# Altium PCB EMGfrontend.PcbDoc
Units mil, origin at the board's own origin, x right, y up, seen from the top; angles counter-clockwise.
Board outline 1790 x 1350 mil, 2 copper layers (Top Layer, Bottom Layer), stack 62.2 mil thick; 35 components, 25 nets, 96 pads, 26 vias.
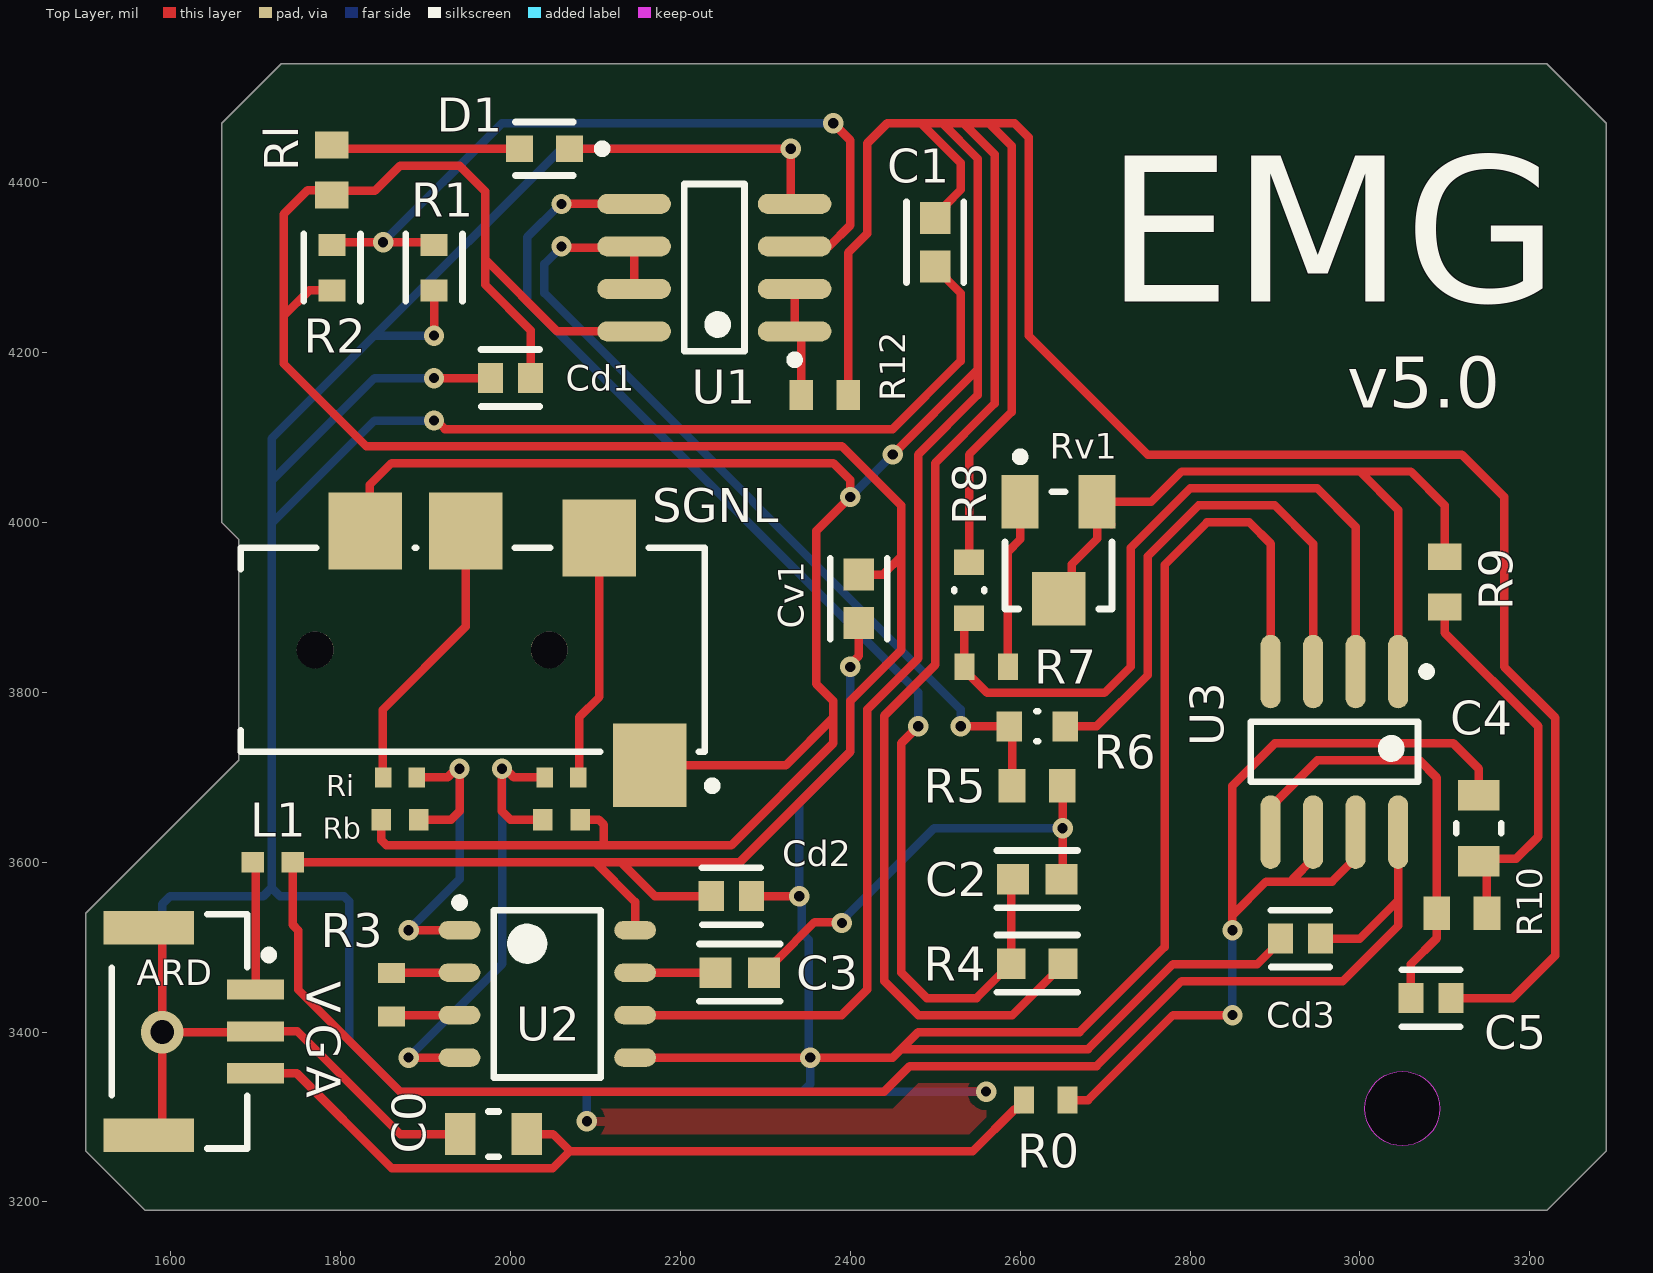
[diagram p0: Top Layer view]
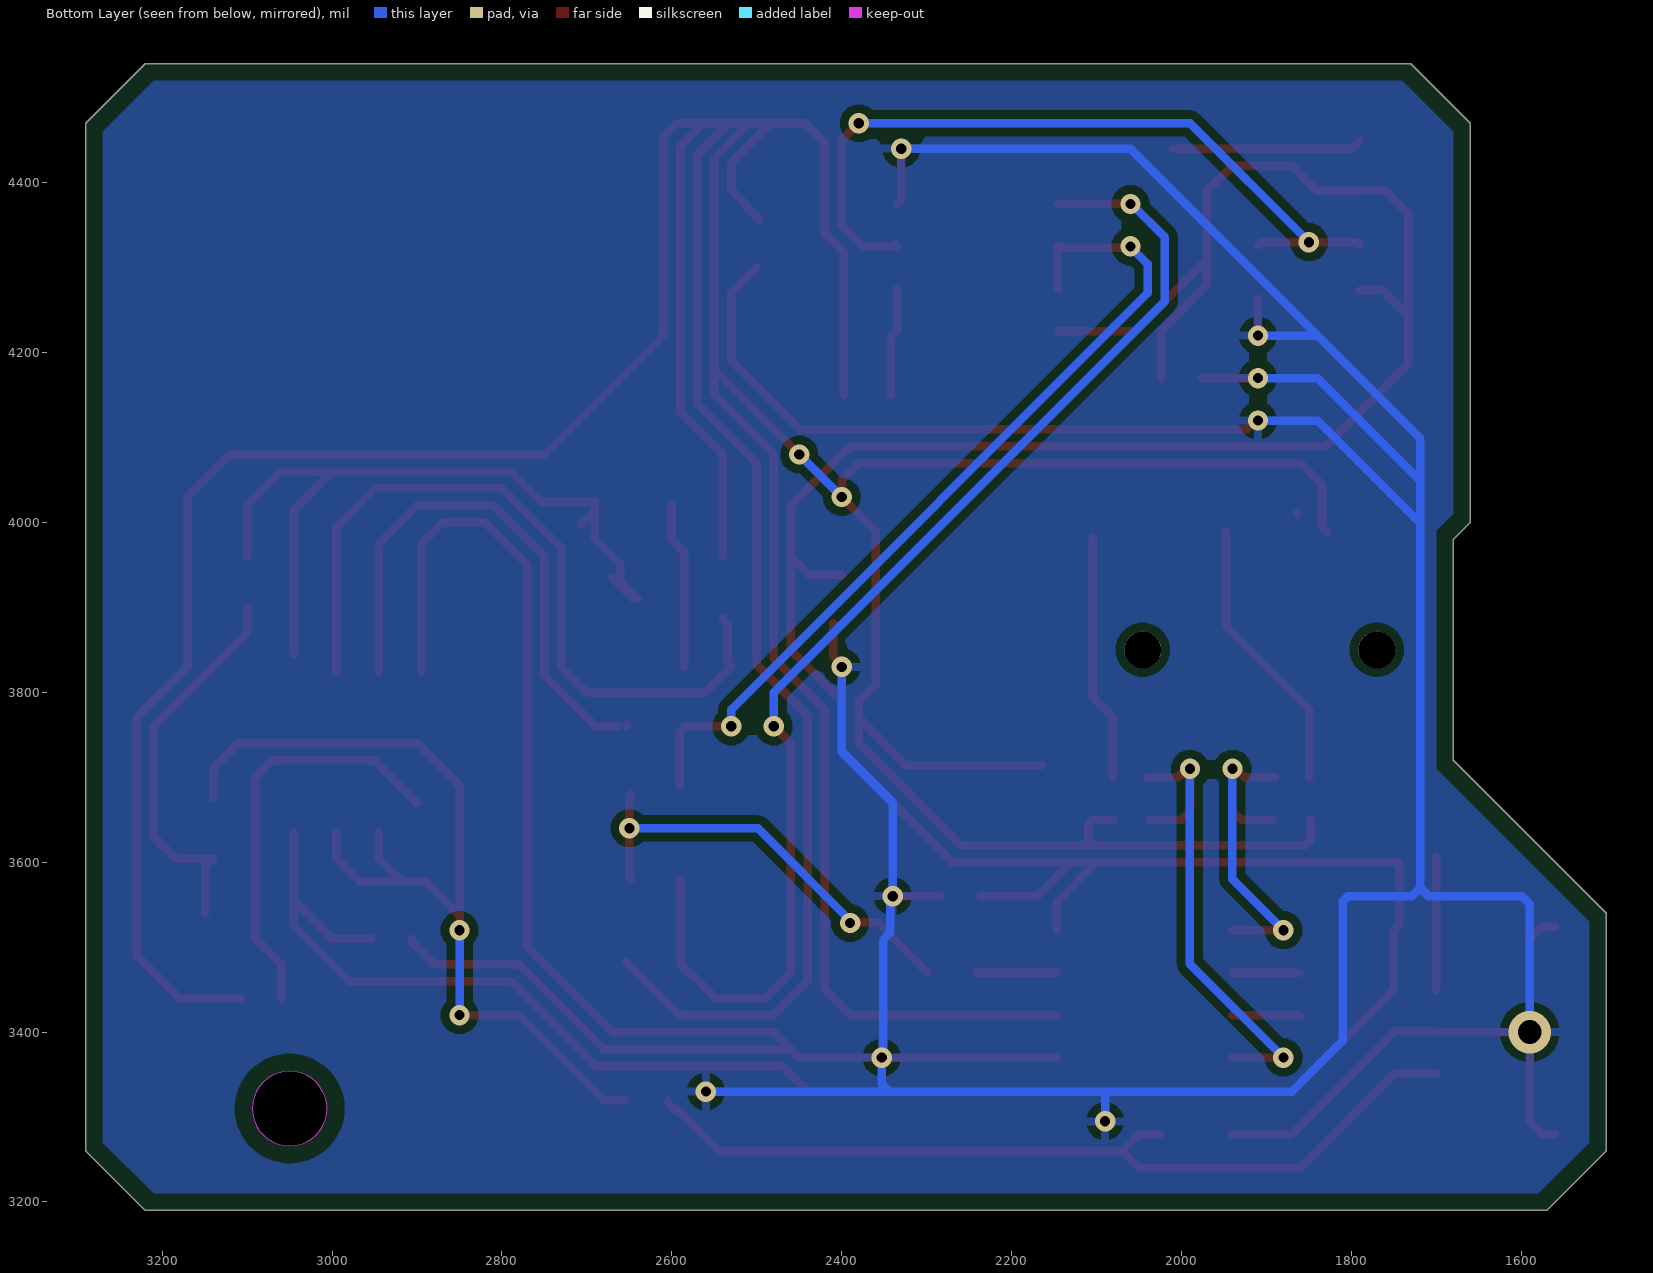
[diagram p1: Bottom Layer view, seen from below]
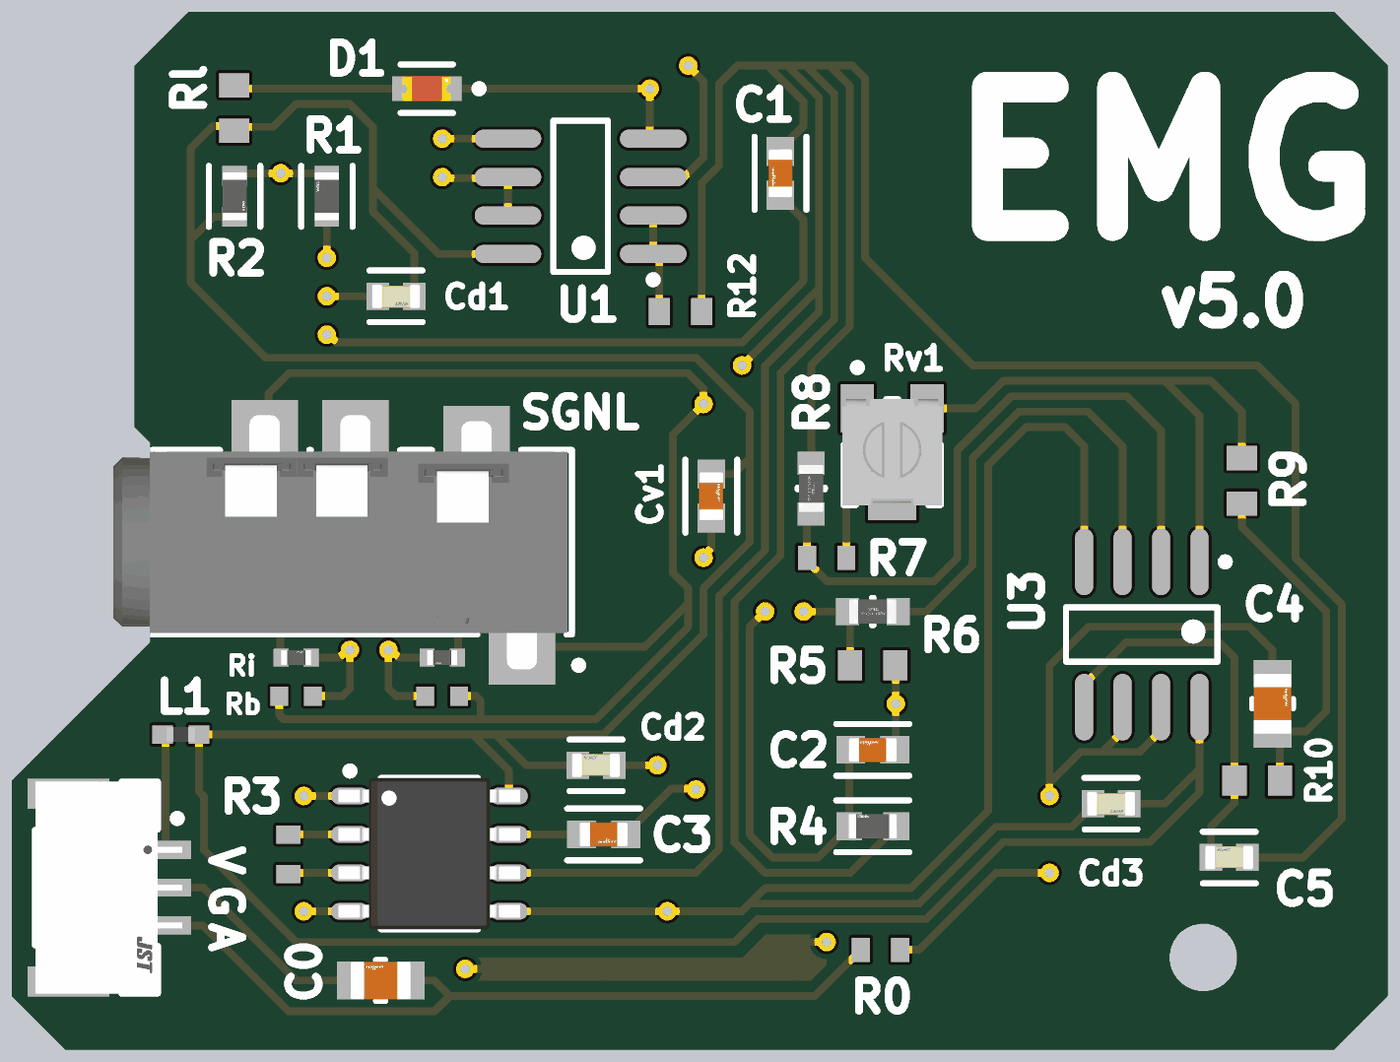
[diagram p2: 3D render of the assembled board from above, using the file's embedded part models]

## Layer stack, top to bottom
Top Solder: solder mask 0.4, Solder Resist, Dk 3.5
Top Layer: signal copper 1.4
Dielectric 1: dielectric 59.4, FR-4, Dk 4.8
Bottom Layer: signal copper 1.4
Bottom Solder: solder mask 0.4, Solder Resist, Dk 3.5

## Board outline
1500,3260 1500,3540 1680,3720 1680,3980 1660,4000 1660,4470 1730,4540 3220,4540 3290,4470 3290,3260 3220,3190 1570,3190
cut-out: 3050,3266 cw(c3050,3310) 3006,3310 cw(c3050,3310) 3050,3354 cw(c3050,3310) 3094,3310 cw(c3050,3310)

## Design rules (kind name [scope] priority, off if disabled: settings)
Clearance Cutout-clearance [InPolygon vs IsBoardCutoutRegion] p1: gap=20 ignorepadtopadclearanceinfootprint=FALSE
Clearance [All] p2: gap=10 ignorepadtopadclearanceinfootprint=FALSE
PolygonConnect [All] p1: connectstyle=Relief reliefconductorwidth=10 reliefentries=4 polygonreliefangle="90 Angle" airgapwidth=10
RoutingVias [All] p1: holewidth=12 width=24 viastyle="Through Hole" minholewidth=12 minwidth=24 maxholewidth=28 maxwidth=50
SolderMaskExpansion [All] p1: expansion=4 istentingtop=FALSE
Width [All] p1: maxlimit=10 minlimit=10 preferedwidth=10
30 further rules are at their usual default settings.

## Classes and differential pairs
component class VREF: C1 Cd1 R1 R2 R12 U1
component class LPF(500Hz): C4 C5 Cd3 R9 R10
component class HPF(20Hz): C2 C3 R4 R5
component class EMGfrontend: ARD C0 Cv1 D1 L1 R0 Rl SGNL
component class AMP2: R6 R7 R8 Rv1 U3
component class AMP1: Cd2 R3 U2

## Components (designator, comment, footprint, x,y, rotation, side; value= is the part's Value field where it differs from the comment)
ARD "SM03B-GHS-TB(LF)(SN)" FP-SM03B-GHS-TB_LF_SN-MFG 1610.43,3400.79 r270 top
C0 "GRM2165C1H223JA01D" FP-GRM216-0_1-0_05-D 1980,3280 r180 top
C1 "GRT188R61H105KE13D" FP-GRT188-0_1-E0_2_0_5-IPC_B 2500,4330 r270 top
C2 "GRT188R61H105KE13D" FP-GRT188-0_1-E0_2_0_5-IPC_B 2620,3580 r180 top
C3 "GRT188R61H105KE13D" FP-GRT188-0_1-E0_2_0_5-IPC_B 2270,3470 r0 top
C4 "GRM2165C1H223JA01D" FP-GRM216-0_1-0_05-D 3140,3640 r90 top
C5 "C0603C103J3GAC7411" FP-C0603C-CF-MFG 3083.62,3440 r0 top value="10,000 pF"
Cd1 "C0603C104J5RACTU" FP-C0603C-CF-MFG 2000,4170 r180 top value="0.10 μF"
Cd2 "C0603C104J5RACTU" FP-C0603C-CF-MFG 2260,3560 r0 top value="0.10 μF"
Cd3 "C0603C104J5RACTU" FP-C0603C-CF-MFG 2930,3510 r180 top value="0.10 μF"
Cv1 "GRT188R61H105KE13D" FP-GRT188-0_1-e0_2_0_5-IPC_B 2410,3910 r90 top
D1 "SML-LX0603SIW-TR" FP-SML-LX0603SIW-TR-MFG 2040,4440 r180 top
L1 "7427927170" SMD-0402 1720,3600 r0 top
R0 "RC0603FR-07470RL" RESC1608X55X25LL10T15 2630,3320 r180 top
R1 "RC0603FR-0710KL" FP-RC0603-0_55-IPC_C 1910,4300 r90 top
R2 "RC0603FR-0710KL" FP-RC0603-0_55-IPC_C 1790,4300 r270 top
R3 "RC0603FR-0715KL" RESC1608X55X25LL10T15 1859.85,3444.05 r90 top
R4 "AC0603FR-1311KL" FP-AC0603-IPC_B 2620,3480.58 r180 top
R5 "RC0603FR-075K6L" RESC1608X55X25ML10T15 2620,3690 r180 top
R6 "RP73PF1J1K0BTDF" FP-RP73P-1J-MFG 2620,3760 r0 top value=1KΩ
R7 "RC0603FR-0739KL" RESC1608X55X25LL10T15 2560,3830 r0 top
R8 "RP73PF1J1K0BTDF" FP-RP73P-1J-MFG 2540,3920 r270 top value=1KΩ
R9 "RC0603FR-0722KL" RESC1608X55X25ML10T15 3100,3930 r270 top
R10 "RC0603FR-0722KL" RESC1608X55X25ML10T15 3120,3540 r180 top
R12 "RC0603FR-0722RL" RESC1608X55X25NL10T15 2370,4150 r0 top
Rb "RC0402FR-0710ML" RESC1005X40X25MML05T10 1870,3650 r180 top (schematic designator Rb2)
Rb1 "RC0402FR-0710ML" RESC1005X40X25MML05T10 2060,3650 r0 top
Ri "RC0402FR-075KL" FP-RC0402-MFG-TINY 1870,3700 r0 top value=5kΩ (schematic designator Ri2)
Ri1 "RC0402FR-075KL" FP-RC0402-MFG-TINY 2060,3700 r180 top value=5kΩ
Rl "RC0603FR-07620RL" RESC1608X55X25ML10T15 1789.44,4414.92 r270 top (schematic designator RL)
Rv1 "3313J-1-203E" BOUR-3313J-1_V 2645.28,3967.09 r270 top
SGNL "SJ2-3574A-SMT-TR" FP-SJ2-3574A-SMT-TR-MFG 1927.48,3850 r0 top locked
U1 "MCP6002T-E/SN" SOIC-SN8_N 2240,4300 r180 top
U2 "AD8226ARZ" ADI-R-8_L 2043.35,3445 r0 top
U3 "MCP6002T-E/SN" SOIC-SN8_N 2970,3730 r270 top

## Footprints (in the part's own frame and the unit in brackets; to place one, negate y for a bottom-side part, rotate by r counter-clockwise, add the part's x,y. Pads: shape width x height; smd on the part's side, far side on the other; paste and mask are expansions set on the pad)
ADI-R-8_L [mm] "SOIC, 8-Leads, Body 5x4mm, Pitch 1.27mm, IPC High Density"
  oval 1.25x0.55 smd: 1(-2.625,1.905) 2(-2.625,0.635) 3(-2.625,-0.635) 4(-2.625,-1.905) 5(2.625,-1.905) 6(2.625,-0.635) 7(2.625,0.635) 8(2.625,1.905)
  silkscreen extent -2.75,-2.5 1.6,2.85, body extent -3,-2.5 3,2.5, height 1.75
BOUR-3313J-1_V [mm] "SMD, 3-Leads, Body 3.5x3.2mm, Pitch 1.15mm"
  rect 1.6x1.1 smd paste+0: 1(-1.45,-1.15) 3(-1.45,1.15)
  rect 1.6x1.6 smd paste+0: 2(1.45,0)
  silkscreen extent -2.92,-1.6 1.75,1.6, body extent -1.75,-1.65 1.75,1.65, height 2.11
FP-AC0603-IPC_B [mil]
  rect 33.81x35.91 smd paste+0 mask+0: 1(-30.58,0) 2(30.58,0)
  silkscreen extent -47,-34 47,34, body extent -57,-28 57,28, height 10
FP-C0603C-CF-MFG [mm]
  rect 0.75x0.9 smd paste+0 mask+0: 1(-0.6,0) 2(0.6,0)
  silkscreen extent -0.87,-0.85 0.88,0.85, body extent -1.2,-0.6 1.2,0.6, height 0.25
FP-GRM216-0_1-0_05-D [mil]
  rect 36x49.21 smd paste+0 mask+0: 1(-39,0) 2(39,0)
  silkscreen extent -6,-27 6,27, body extent -51,-31 51,31, height 10
FP-GRT188-0_1-E0_2_0_5-IPC_B [mil]
  rect 37.74x35.91 smd paste+0 mask+0: 1(-28.61,0) 2(28.61,0)
  silkscreen extent -47,-34 47,34, body extent -57,-28 57,28, height 10
FP-GRT188-0_1-e0_2_0_5-IPC_B [mil]
  rect 37.74x35.91 smd paste+0 mask+0: 1(-28.61,0) 2(28.61,0)
  silkscreen extent -47,-34 47,34, body extent -57,-28 57,28, height 10
FP-RC0402-MFG-TINY [mm]
  rect 0.5x0.6 smd paste+0 mask+0: 1(-0.5,0) 2(0.5,0)
  body extent -0.85,-0.4 0.85,0.4, height 0.25
FP-RC0603-0_55-IPC_C [mil]
  rect 25.93x31.97 smd paste+0 mask+0: 1(-26.64,0) 2(26.64,0)
  silkscreen extent -40,-33 40,33, body extent -44,-22 44,22, height 10
FP-RP73P-1J-MFG [mil]
  rect 30x35.43 smd paste+0 mask+0: 1(-33,0) 2(33,0)
  silkscreen extent -1,-18 1,18, body extent -59,-22 59,22, height 10
FP-SJ2-3574A-SMT-TR-MFG [mm]
  rect 2.2x2.5 smd paste+0 mask+0: 1(6,-3.45)
  rect 2.2x2.3 smd paste+0 mask+0: 2(4.5,3.35) 3(0.5,3.55) 4(-2.5,3.55)
  round 1.1 hole 1.1 unplated paste-2539.97 mask+0: ""(-4,0) ""(3,0)
  silkscreen extent -6.22,-4.19 8,3.05, body extent -7.75,-4.8 7.75,4.8, height 0.25
FP-SM03B-GHS-TB_LF_SN-MFG [mm]
  rect 0.6x1.7 smd paste+0 mask+0: 1(-1.25,2.275) 2(0,2.275) 3(1.25,2.275)
  rect 1x2.7 smd paste+0 mask+0: 4(-3.1,-0.925) 5(3.1,-0.925)
  silkscreen extent -3.5,-2.03 3.5,2.79, body extent -3.7,-2.37 3.7,3.22, height 0.25
FP-SML-LX0603SIW-TR-MFG [mm]
  rect 0.8x0.8 smd paste+0 mask+0: 1(-0.75,0) 2(0.75,0)
  silkscreen extent -1.85,-0.8 0.86,0.8, body extent -1.25,-0.56 1.25,0.56, height 0.25
RESC1005X40X25MML05T10 [mil] "Chip Resistor, 2-Leads, Body 1.00x0.50mm, IPC High Density"
  rect 23x25 smd: 1(-22,0) 2(22,0)
  body extent -21,-11 21,11, height 16
RESC1608X55X25LL10T15 [mm] "Chip Resistor, 2-Leads, Body 1.70x0.90mm, IPC High Density"
  rect 0.6x0.8 smd: 1(-0.65,0) 2(0.65,0)
  body extent -0.85,-0.45 0.85,0.45, height 0.55
RESC1608X55X25ML10T15 [mm] "Chip Resistor, 2-Leads, Body 1.70x0.90mm, IPC Low Density"
  rect 0.8x1 smd: 1(-0.75,0) 2(0.75,0)
  body extent -0.85,-0.45 0.85,0.45, height 0.55
RESC1608X55X25NL10T15 [mm] "Chip Resistor, 2-Leads, Body 1.70x0.90mm, IPC Medium Density"
  rect 0.7x0.9 smd: 1(-0.7,0) 2(0.7,0)
  body extent -0.85,-0.45 0.85,0.45, height 0.55
SMD-0402 [mm] "Chip Inductor, 2-Leads, Body 1.0x0.5mm"
  rect 0.675x0.6 smd: 1(-0.6,0) 2(0.6,0)
  body extent -0.5,-0.25 0.5,0.25, height 0.49
SOIC-SN8_N [mm] "SOIC, 8-Leads, Body 4.9x3.9mm, Pitch 1.27mm, IPC Medium Density"
  oval 2.2x0.6 smd: 1(-2.4,1.905) 2(-2.4,0.635) 3(-2.4,-0.635) 4(-2.4,-1.905) 5(2.4,-1.905) 6(2.4,-0.635) 7(2.4,0.635) 8(2.4,1.905)
  silkscreen extent -2.53,-2.5 0.9,2.88, body extent -2,-2.5 2,2.5, height 1.75

## Part data
ARD: library part CMP-17439-000068-1, "CONN HEADER SMD R/A 3POS 1.25MM", Color=Natural, Current Rating=1A, Flammability Rating="UL94 V-0", Max Operating Temperature=85°C, Min Operating Temperature=-25°C, Voltage Rating=50V, Connector Type=Header, Contact Finish - Mating=TIN, Contact Material=Bronze, Contact Plating=Tin, Contact Shape=Rectangular, Contact Type="Outer Shroud Contact", Fastening Type=Ramp, Gender=Male, Housing Color=Natural, Housing Material=Nylon, Insulation Color=Natural, Insulation Material=Nylon, Lead Free="Lead Free", Mount="Surface Mount", Number of Contacts=3, Number of Positions=3, Number of Rows=1, Orientation="Right Angle", Packaging="Tape and Reel", Pitch=0.049inch, REACH SVHC="No SVHC", Series=GH, Termination=Solder, Voltage Rating (AC)=50V, Wire/Cable Gauge=26AWG
C0 C4: library part CMP-06035-050815-1, "Chip Multilayer Ceramic Capacitors for General Purpose, 0805, 22000pF, C0G, 30ppm/°C, 5%, 50V"
C1 C2 C3 Cv1: library part CMP-06035-031856-1, "Multi-Layer Ceramic Capacitor 1uF 50V X5R ±10% 0603 Paper T/R", Capacitance=1uF, Case Code (Imperial)=0603, Case Code (Metric)=1608, Dielectric=X5R, Max Operating Temperature=85°C, Min Operating Temperature=-55°C, Ratings=AEC-Q200, Tolerance=10%, Voltage Rating=50V, Case/Package=0603, Length=0.063inch, Mount="Surface Mount", Packaging="Tape and Reel", Thickness=0.035inch, Voltage Rating (DC)=50V, Width=0.031inch
C5: library part CMP-03020-031050-2, "C0603 10,000 pF C0G 30ppm/°C 5.00% 25 V", Capacitance="10,000 pF", Manufacturer=KEMET, Package=C0603C-CF, Temperature="-55°C to +125°C", Temperature Characteristic=C0G, Temperature Coefficient=30ppm/°C, Temperature Range High=+125°C, Temperature Range Low=-55°C, Tolerance=0.05, Voltage Rating="25 V", Automotive=Yes, Automotive Grade="Grade 1", Category=Cap, ComponentLink2Description=Datasheet, ComponentLink2URL=https://api.kemet.com/component-edge/download/datasheet/C0603C100J5GACAUTO.pdf, Device Class L1="Passive Components", Device Class L2=Capacitors, Device Class L3="Ceramic Capacitors", Height=0.87mm, Lead Free=Yes, Manufacturer Part Number=C0603C103J3GAC7411, Material=Ceramic, Octopart=https://octopart.com/c0603c103j3gac7411-kemet-91893810, RoHS=TRUE
Cd1 Cd2 Cd3: library part CMP-2006-03056-2, "CAP CER 0.1UF 50V 5% X7R 0603", Capacitance="0.10 μF", Manufacturer=KEMET, Package=C0603C-CF, Temperature="-55°C to +125°C", Temperature Characteristic=X7R, Temperature Coefficient=30ppm/°C, Temperature Range High=+125°C, Temperature Range Low=-55°C, Tolerance=0.05, Voltage Rating="50 V", Automotive=Yes, Automotive Grade="Grade 1", Category=Cap, ComponentLink2Description=Datasheet, ComponentLink2URL=https://api.kemet.com/component-edge/download/datasheet/C0603C100J5GACAUTO.pdf, Device Class L1="Passive Components", Device Class L2=Capacitors, Device Class L3="Ceramic Capacitors", Digikey Description="CAP CER 0.1UF 50V 5% X7R 0603", Height=0.87mm, Lead Free=Yes, Manufacturer Part Number=C0603C104J5RACTU, Material=Ceramic, Mouser Description="Multilayer Ceramic Capacitors MLCC - SMD/SMT 50volts 0.1uF X7R 5%", Octopart=https://octopart.com/c0603c104j5ractu-kemet-10440638, RoHS=TRUE
D1: library part CMP-57192-000009-1, "LED RED DIFFUSED SMD", Case Code (Imperial)=0603, Case Code (Metric)=1608, Color=Red, Forward Current=20mA, Forward Voltage=2V, Lens Color=White, Max Operating Temperature=85°C, Min Operating Temperature=-25°C, Package Quantity=1, Power Rating=50mW, Approvals=UL, Case/Package=0603, Dominant Wavelength=636nm, Height=0.6mm, Illumination Color=Red, Lead Free="Lead Free", Length=1.6mm, Lens Style=Diffused, Lens Transparency=Diffused, Luminous Intensity=60mcd, Moisture Sensitivity Level=2, Mount="Surface Mount", Number of LEDs=1, Number of Pins=2, Packaging="Tape and Reel", REACH SVHC="No SVHC", RoHS Compliant=Yes, Test Current=20mA, Viewing Angle=140°, Wavelength=636nm, Width=0.8mm
L1: library part CMP-0220-00142-1, "SMD EMI Suppression Ferrite Bead WE-CBF, Z = 75 Ohm", ComponentLink1Description="Manufacturer Link", ComponentLink1URL=http://www.we-online.com, ComponentLink2Description=Datasheet, ComponentLink2URL=http://www.we-online.de/katalog/media/pdf/7427927170.pdf, DatasheetVersion="ver 1, Jul-2009", Impedance="75 Ohm", PackageDescription="Chip Inductor, 2-Leads, Body 1.0 x 0.5 mm", PackageReference=SMD-0402, PackageVersion=2009
R0: library part CMP-1659-00035-2, "General Purpose Chip Resistor, 470 Ohm, +/- 1%, -55 to 155 degC, 0603 (1608 Metric), RoHS, Tape and Reel", Max Operating Temperature="90 degC", Min Operating Temperature="-40 degC", Package Quantity=2500, Resistance="470 Ohm", ComponentLink1Description="Manufacturer URL", ComponentLink1URL=http://www.yageo.com/, ComponentLink2Description=Datasheet, ComponentLink2URL=https://datasheet.ciiva.com/11808/0900766b80f96399-11808177.pdf, Contact Material=Brass, Contact Plating=Gold, DatasheetVersion="Rev. 4, 04/2009", Fastening Type=Snap, Height="1.25 mm", Length="3 mm", Mount="Surface Mount", PackageDescription="2-Pin Surface Mount Device, Body 1.6 x 0.8 mm", PackageReference=0603, Packaging="Tape and Reel", Radiation Hardening=No, RoHSCompliant=true, Width="3.1 mm"
R1 R2: library part CMP-2100-03664-2, "RES 10K OHM 1% 1/10W 0603", Case Code (Imperial)=0603, Case Code (Metric)=1608, Max Operating Temperature=155°C, Max Power Dissipation=100mW, Min Operating Temperature=-55°C, Resistance=10kR, Resistance Tolerance=1%, Resistor Type="Thick Film", Temperature Coefficient=100ppm/°C, Voltage Rating=75V, Voltage Rating (DC)=50V, Case/Package=0603, Construction=Rectangular, Depth=0.8mm, Features="Moisture Resistant", Height=0.45mm, Lead Free="Lead Free", Lead Pitch=0.3mm, Length=1.6mm, Military Standard=Not, Number of Pins=2, Number of Terminations=2, Packaging="Tape and Reel", Power Rating=100mW, RoHS Compliant=Yes, Series=RC, Size Code=0603, Termination=SMD/SMT, Tolerance=1%, Weight=7.1E-05oz, Width=0.8mm
R3: library part CMP-1659-00032-1, "Chip Resistor, 15 KOhm, +/- 1%, 0.1 W, -55 to 155 degC, 0603 (1608 Metric), RoHS, Tape and Reel", ComponentLink1Description="Manufacturer URL", ComponentLink1URL=http://www.yageo.com/, ComponentLink2Description=Datasheet, ComponentLink2URL=http://www.yageo.com/documents/recent/PYu-RC_Group_51_RoHS_L_04.pdf, DatasheetVersion="Rev. 4, 02/2016", PackageDescription="2-Pin Surface Mount Device, Body 1.6 x 0.8 mm", PackageReference=0603, RoHSCompliant=true
R4: library part CMP-03412-047641-1, "RES 11KΩ 1.00% 0.1W 0603", RoHS Compliant=Yes
R5: library part CMP-1012-00595-2, "Chip Resistor, 5.6 KOhm, +/- 1%, 0.1 W, -55 to 155 degC, 0603 (1608 Metric), RoHS, Tape and Reel", Case Code (Imperial)=0603, Case Code (Metric)=1608, Max Operating Temperature="155 degC", Min Operating Temperature="-55 degC", Package Quantity=5000, Power Rating="100 mW", Resistance="332 kohm", Tolerance=1%, Type (Resistor)="Thick Film", Voltage Rating="50 V", Case\Package=0603, ComponentLink1Description="Manufacturer URL", ComponentLink1URL=http://www.yageo.com/, ComponentLink2Description=Datasheet, ComponentLink2URL=http://www.yageo.com/documents/recent/PYu-RC_Group_51_RoHS_L_04.pdf, DatasheetVersion="Rev. 4, 02/2016", Height="0.45 mm", Length="1.6 mm", PackageDescription="2-Pin Surface Mount Device, Body 1.6 x 0.8 mm", PackageReference=0603, Packaging="Tape and Reel", RoHSCompliant=true, Width="0.8 mm"
R6 R8: library part CMP-03211-004517-1, "RES SMD 1K OHM 0.1% 1/6W 0603", Manufacturer="TE Connectivity", Package=RP73P-1J, Power Rating=0.166W, Resistance=1KΩ, Temperature="-55°C to +155°C", Temperature Coefficient=25ppm/°C, Temperature Range High=+155°C, Temperature Range Low=-55°C, Tolerance=0.001, Voltage Rating=100V, Automotive=No, Category=Res, ComponentLink2Description=Datasheet, ComponentLink2URL=https://www.te.com/commerce/DocumentDelivery/DDEController?Action=srchrtrv&DocNm=1773272&DocType=DS&DocLang=English, Composition="Thin Film", Device Class L1="Passive Components", Device Class L2=Resistors, Device Class L3="Chip SMD Resistors", Digikey Description="RES SMD 1K OHM 0.1% 1/6W 0603", Height=0.55mm, Ipc Land Pattern Name=RESC15580X45, Lead Free=Yes, Manufacturer Part Number=RP73PF1J1K0BTDF, Octopart=https://octopart.com/rp73pf1j1k0btdf-te+connectivity-45465729, RoHS=TRUE, Series=RP73P
R7: library part CMP-2000-06940-1, "Chip Resistor, 39 KOhm, +/- 1%, 0.1 W, -55 to 155 degC, 0603 (1608 Metric), RoHS, Tape and Reel", Case Code - in=0603, Case Code - mm=1608, Manufacturer=Yageo, Operating Temperature Range=-55Cto+155C, Package Description="2-Pin Surface Mount Device, Body 1.6 x 0.8 mm", Power Rating=100mW, Resistance=39kOhms, Temperature Coefficient=100PPM/C, Tolerance=1%, Voltage Rating=50V, Datasheet URL=http://www.yageo.com/documents/recent/PYu-RC_Group_51_RoHS_L_7.pdf, Datasheet Version="Rev. 7, 05/2017", Manufacturer URL=http://www.yageo.com/, Mounting Technology=SurfaceMount, Package Reference=0603, Packaging=Reel, Product=ThickFilmResistorsGeneralPurpose, Series=RC, Termination Style=SMD/SMT
R9 R10: library part CMP-1012-00659-3, "Chip Resistor, 22 KOhm, +/- 1%, 0.1 W, -55 to 155 degC, 0603 (1608 Metric), RoHS, Tape and Reel", Case/Package=Radial, Current Rating="290 mA", Max Operating Temperature=105degC, Min Operating Temperature=-55degC, Package Quantity=100, Resistance="2.9 Ohm", Tolerance=10%, ComponentLink1Description="Manufacturer URL", ComponentLink1URL=http://www.yageo.com/, ComponentLink2Description=Datasheet, ComponentLink2URL=http://www.yageo.com/documents/recent/PYu-RC_Group_51_RoHS_L_04.pdf, DatasheetVersion="Rev. 4, 02/2016", Diameter="8.5 mm", Height="11 mm", Lead Pitch="5 mm", Mount="Through Hole", PackageDescription="2-Pin Surface Mount Device, Body 1.6 x 0.8 mm", PackageReference=0603, Packaging=Bulk, Pins=2, Radiation Hardening=No, REACH SVHC="No SVHC", RoHSCompliant=True, Shielding=Unshielded
R12: library part CMP-1659-00033-1, "Chip Resistor, 22 Ohm, +/- 1%, 0.1 W, -55 to 155 degC, 0603 (1608 Metric), RoHS, Tape and Reel", Case\Package=SIP, Max Input Voltage="1.4 V", Max Operating Temperature="100 degC", Max Ouput Current="8 A", Min Operating Temperature="-25 degC", Package Quantity=200, ComponentLink1Description="Manufacturer URL", ComponentLink1URL=http://www.yageo.com/, ComponentLink2Description=Datasheet, ComponentLink2URL=http://www.yageo.com/documents/recent/PYu-RC_Group_51_RoHS_L_04.pdf, DatasheetVersion="Rev. 4, 02/2016", Height="19.6 mm", Length="18.5 mm", Mount="Through Hole", Output Current="8 A", PackageDescription="2-Pin Surface Mount Device, Body 1.6 x 0.8 mm", PackageReference=0603, Packaging=Rail/Tube, Pins=4, Radiation Hardening=No, REACH SVHC=Unknown, RoHSCompliant=true
Rb Rb1: library part CMP-2002-07354-1, Manufacturer="Yageo / Phycomp", Part Number=RC0402FR-0710ML
Ri Ri1: library part CMP-03412-013078-1, "RES SMD 5K OHM 1% 1/16W 0402", Manufacturer=Yageo, Package=RC0402, Power Rating=0.0625W, Resistance=5kΩ, Temperature="-55°C to +155°C", Temperature Coefficient=100ppm/°C, Temperature Range High=+155°C, Temperature Range Low=-55°C, Tolerance=1%, Voltage Rating=50V, Automotive=No, Category=Res, ComponentLink2Description=Datasheet, ComponentLink2URL=http://www.yageo.com/documents/recent/PYu-RC_Group_51_RoHS_L_10.pdf, Composition="Thick Film", Device Class L1="Passive Components", Device Class L2=Resistors, Device Class L3="Chip SMD Resistors", Digikey Description="RES SMD 5K OHM 1% 1/16W 0402", Footprint Url=https://pccomponents.com/datasheets/YAGEO-20RESISTORS.PDF, Height=0.4mm, Ipc Land Pattern Name=RESC10050X35, Lead Free=Yes, Manufacturer Part Number=RC0402FR-075KL, Octopart=https://octopart.com/rc0402fr-075kl-yageo-25450038, RoHS=TRUE, Series=RC_L
Rl: library part CMP-2000-04103-1, Manufacturer=Yageo, Part Number=RC0603FR-07620RL
Rv1: library part CMP-2000-05586-1, "3 mm Trimpot(R) Trimming Potentiometer, 20 KOhm, +/- 20%, 0.125 W, -55 to 125 degC, 3-Pin SMD, RoHS, Tape and Reel", Dielectric Strength=500VAC, Insulation Resistance=100Megohms(Min.)@500VDC, Manufacturer=Bourns, Package Description="3-Pin Surface Mount Device, Body 3.5 x 3.2 mm, Pitch 1.15 mm", Package Reference=3313J-1, Power, Rating=0.125W, Resistance=20Kilohms, Resistance, Insulation=100Megohms, Temperature Coefficient=±100ppm/°C, Temperature, Operating, Maximum=+125°C, Temperature, Operating, Minimum=-55°C, Tolerance=±20%, Angle, Mechanical=250°, Brand/Series=Trimpot®3313-SealedSeries, Datasheet URL=http://www.bourns.com/docs/Product-Datasheets/3313.pdf, Datasheet Version=05/2016, Dimensions="0.126\"Lx0.138\"Wx0.087\"H", Load Life=1000hr@0.125W,70°C, Manufacturer URL=http://www.bourns.com/, Material, Element=Cermet, Mounting Technology=SurfaceMount, Mounting Type=SurfaceMount, Number of Turns=1, Resolution=Infinite, Rotational Life=100Cycles, Standards=RoHSCompliant, Termination=SMD, Torque=50g-cm, Type=Trimmer
SGNL: library part CMP-14818-000001-1, "AUDIO JACK, 3.5 MM, RT, 4 CONDUC", Current Rating=1A, Manufacturer=CUI, Temperature="-25°C to +85°C", Temperature Range High=+85°C, Temperature Range Low=-25°C, Voltage Rating=12V, Automotive=No, Category=Conn, ComponentLink2Description=Datasheet, ComponentLink2URL=https://www.cui.com/product/resource/sj2-357x-smt.pdf, Conn Orientation=Horizontal, Contact Material=Silver, Device Class L1=Connectors, Device Class L2="Audio / Video Connectors", Device Class L3=unset, Digikey Description="AUDIO JACK, 3.5 MM, RT, 4 CONDUC", Height=5.3mm, Lead Free=Yes, Manufacturer Part Number=SJ2-3574A-SMT-TR, Number of Contacts=4, Octopart=https://octopart.com/sj2-3574a-smt-tr-cui-77838840, Package=SJ2-3574A-SMT-TR, RoHS=TRUE
U1 U3: library part CMP-0187-00363-3, "None", Case/Package=SOIC, Input Bias Current=1pA, Input Offset Voltage (Vos)=4.5mV, Max Operating Temperature=125°C, Max Supply Voltage=6V, Min Operating Temperature=-40°C, Min Supply Voltage=1.8V, Nominal Supply Current=100uA, Operating Supply Voltage=5.5V, Output Current=23mA, Package Quantity=3300, Power Supply Rejection Ratio (PSRR)=86dB, Voltage Gain=112dB, Amplifier Type="GENERAL PURPOSE", Common Mode Rejection Ratio=60dB, Gain Bandwidth Product=1MHz, Lead Free="Lead Free", Mount="Surface Mount", Number of Channels=2, Number of Circuits=2, Number of Elements=2, Number of Pins=8, Operating Supply Current=100uA, Output Current per Channel=23mA, Packaging="Tape and Reel", Radiation Hardening=No, RoHS Compliant=Yes, Series=-, Slew Rate=0.6V/µs, Supply Current=100uA, Technology=CMOS, Unity Gain Bandwidth Product=1MHz
U2: library part CMP-2000-05749-1, "Wide Supply Range, Rail-to-Rail Output Instrumentation Amplifier, 2.2 to 36 V, -40 to 125 degC, 8-Pin SOIC (R-8), RoHS, Tube", Current - Input Bias=20nA, Current - Output / Channel=13mA, Current - Supply=350µA, Manufacturer="Analog Devices", Operating Temperature=-40°C~125°C, Package / Case="8-SOIC(0.154\",3.90mmWidth)", Package Description="8-Pin Small Outline Package, Body 4.9 x 3.9 mm, Pitch 1.27 mm", Package Reference=R-8, Standard Package=98, Supplier Device Package=8-SOIC, Voltage - Input Offset=100µV, Voltage - Supply, Single/Dual (±)=2.2V~36V,±1.35V~18V, -3db Bandwidth=1.5MHz, Amplifier Type=Instrumentation, Category=IntegratedCircuits(ICs), Datasheet URL=http://www.analog.com/media/en/technical-documentation/data-sheets/AD8226.pdf, Datasheet Version="Rev. C, 09/2012", Design Resources=PLCandDCSUniversalAnalogInputUsingEither4or6-PinTerminalBlock, EDA / CAD Models=DownloadfromAcceleratedDesigns, Family=Linear-Amplifiers-Instrumentation,OPAmps,BufferAmps, Gain Bandwidth Product=-, Manufacturer URL=http://www.analog.com/, Mfg Application Notes=AutomaticExternalDefibrillator(AED)SolutionsElectromagneticFlowMeterSolutionsMotorControlSolution—ServoControlProgrammableLogicControllers(PLCs)SolutionsElectrocardiogram(ECG)Solutions, Mounting Technology=SurfaceMount, Mounting Type=SurfaceMount, Number of Circuits=1, Online Catalog=Instrumentation, Output Type=Rail-to-Rail, Packaging=Tube, PCN Design/Specification=PolyimideAlignmentTarget11/Aug/2015, Product Training Modules=CommonPhotodiodeOp-AmpCircuitProblemsandSolutionsIndirectCurrentFeedbackInstrumentationAmplifierApplicationsGuide, Series=-, Slew Rate=0.6V/µs

## Via types
v1: diameter 24, hole 12, Top Layer to Bottom Layer, 25 vias
v2: diameter 50, hole 28, Top Layer to Bottom Layer, 1 vias

## Nets (pads, with @x,y where several pads share a name; then routed paths per layer and width w, separated by ;. In a path a pad name is that pad's centre, name@x,y a point inside that pad or via, vN(x,y) a via of type N, cw(c..) or ccw(c..) an arc to the next point about the centre after c; other vN are vias at no path point)
NetARD_1: ARD.1 L1.1 | length 156.5
  Top Layer w10: ARD.1 L1.1@1700,3606.55
NetARD_2: ARD.2 ARD.4 ARD.5 C0.2 C1.2 Cd1.2 Cd2.2 Cd3.2 Cv1.1 D1.1 R1.1 U1.4 U2.5 U3.4 | length 7677.6
  Top Layer w10: ARD.5@1560,3280 1575.31,3280 1590,3294.69 v2(1590,3400) ; ARD.4@1560,3524.09 1575.31,3524.09 1590,3509.41 v2(1590,3400) ; v1(1910,4120) 1912.86,4120 1922.86,4110 2450,4110 2530,4190 2530,4270 C1.2@2500,4300 ; v1(1910,4170) Cd1.2 ; v1(1910,4220) R1.1@1910,4263.36 ; C0.2 1870,3280 1749.21,3400.79 ARD.2 1699.21,3400 v2(1590,3400) ; D1.1 v1(2330,4440) 2330,4379.49 U1.4 ; U2.5 v1(2352.86,3370) 2450,3370 2460,3380 ; Cd2.2@2284.01,3560 v1(2340,3560) ; v1(2400,3830) 2400,3832.86 2410,3842.86 Cv1.1 ; U3.4 2895,3975 2870,4000 2820,4000 2770,3950 2770,3500 2670,3400 2480,3400 2460,3380 ; Cd3.2 2906.38,3507.05 2896.61,3497.28 2879.33,3480 2780,3480 2680,3380 2460,3380
  Bottom Layer w10: v2(1590,3400) 1590,3550.72 1599.28,3560 1708.84,3560 1718.74,3569.9 ; v1(1910,4120) 1840,4120 1718.74,3998.74 ; v1(1910,4170) 1840,4170 1718.74,4048.74 ; v1(1910,4220) 1840,4220 ; v1(2090,3295) 2090,3330 ; v1(2330,4440) 2060,4440 1840,4220 ; 2342.68,3517.32 2342.68,3519.25 ; 2342.68,3520.25 2342.68,3557.32 v1(2340,3560) 2340,3670 2400,3730 v1(2400,3830) ; 2343.39,3516.61 2351.43,3508.57 2351.43,3371.43 v1(2352.86,3370) 2352.86,3338.72 2344.14,3330 ; v1(2560,3330) 2344.14,3330 ; 1718.74,3569.9 1718.74,3998.74 ; 1718.74,3569.9 1728.64,3560 1804.14,3560 1810,3554.14 1810,3390 1870,3330 2090,3330 ; 1718.74,3998.74 1718.74,4048.74 ; 1718.74,4048.74 1718.74,4098.74 1840,4220 ; 2090,3330 2344.14,3330
NetARD_3: ARD.3 C0.1 R0.2 | length 1038.9
  Top Layer w10: ARD.3 1748.43,3351.57 1860,3240 2050,3240 2070,3260 ; C0.1@2025.43,3280 2050,3280 2070,3260 ; R0.2 2604.41,3316.06 2597.6,3309.25 2593.66,3309.25 2544.41,3260 2070,3260
NetC1_1: C1.1 C5.2 R4.1 R8.1 R12.2 Rb1.2 Rb.2 SGNL.1 SGNL.4 U2.6 | length 7587.7
  Top Layer w10: SGNL.4 1834.18,3994.89 1834.18,4044.18 1860,4070 2380,4070 2400,4050 v1(2400,4030) 2360,3990 2360,3810 2380,3790 2380,3770 ; Rb.2 1848,3625.86 1853.86,3620 2110,3620 ; SGNL.4@1863.46,4009.76 SGNL.4@1863.46,4011.73 ; Rb1.2@2080,3650 2104.14,3650 2110,3644.14 2110,3620 ; U2.6 2390,3420 2420,3450 2420,3780 2480,3840 2480,4080 2550,4150 2550,4180 ; SGNL.1 2324.17,3714.17 2380,3770 ; R12.2 2397.56,4317.56 2420,4340 2420,4446.51 2443.49,4470 2483.49,4470 ; v1(2450,4080) 2550,4180 ; C1.1@2497.1,4356.63 2512.96,4372.48 2512.96,4374.45 2530,4391.5 2530,4423.49 2483.49,4470 ; R8.1@2540,3960 2540,4080 2590,4130 2590,4443.49 2563.49,4470 ; R4.1@2653.96,3482.9 2638.68,3467.62 2638.54,3467.62 2590.92,3420 2480,3420 2440,3460 2440,3772.47 2500,3832.47 2500,4070 2570,4140 2570,4433.49 2533.49,4470 ; C5.2 3180,3440 3230,3490 3230,3770 3170,3830 3170,4030 3120,4080 2750,4080 2610,4220 2610,4453.49 2593.49,4470 2563.49,4470 ; 2110,3620 2260,3620 2380,3740 2380,3770 ; 2483.49,4470 2508.49,4470 ; 2508.49,4470 2550,4428.49 2550,4180 ; 2508.49,4470 2533.49,4470 ; 2533.49,4470 2563.49,4470
  Bottom Layer w10: v1(2400,4030) v1(2450,4080)
NetC2_1: C2.1 C3.2 R5.1 | length 526.5
  Top Layer w10: C3.2 2299.53,3470 2312.48,3482.96 2312.48,3483.87 2358.11,3529.5 2389.11,3529.5 v1(2390.11,3528.5) ; R5.1@2647.56,3680 2650,3677.56 v1(2650,3640) 2650,3581.39 C2.1
  Bottom Layer w10: v1(2390.11,3528.5) 2390.11,3531.5 2498.61,3640 v1(2650,3640)
NetC2_2: C2.2 R4.2 U1.5 | length 1465.5
  Top Layer w10: v1@2058.89,4374.94 U1.5@2145.46,4374.94 ; v1(2480,3760) 2460,3740 2460,3470 2490,3440 2548.84,3440 2576.47,3467.62 2577.52,3467.62 2588.96,3479.07 R4.2@2588.96,3480.12 ; R4.2 2589.42,3578.03 C2.2
  Bottom Layer w10: v1@2058.89,4374.94 2019.82,4335.88 2019.82,4260.18 2480,3800 v1(2480,3760)
  other v1: 2060,4375
NetC3_1: C3.1 U2.7 | length 94.7
  Top Layer w10: U2.7 C3.1
NetC4_1: C4.1 R9.2 R10.1 | length 464.8
  Top Layer w10: R9.2 3100,3870 3210,3760 3210,3630 3184,3604 3140,3604 3149.53,3594.47 R10.1
NetC4_2: C4.2 R0.1 U3.6 U3.7 | length 1131.8
  Top Layer w10: R0.1 2680,3320 2780,3420 v1(2850,3420) ; v1(2850,3520) 2850,3537.62 ; 2920.98,3580 2945,3604.02 U3.6 ; U3.7 2995,3605 2967.2,3577.2 2889.58,3577.2 2850,3537.62 ; C4.2@3140,3676 3140,3710 3110,3740 2900,3740 2850,3690 2850,3537.62
  Bottom Layer w10: v1(2850,3420) v1(2850,3520)
NetC5_1: C5.1 R10.2 U3.5 | length 491.8
  Top Layer w10: U3.5@2900,3670 2950,3720 3070,3720 3090.47,3699.53 R10.2 3090.47,3510.47 3060,3480 C5.1
NetCd1_1: Cd1.1 Cd2.1 Cd3.1 Cv1.2 L1.2 R2.2 Rl.2 U1.8 U2.8 U3.8 | length 4883.3
  Top Layer w10: R2.2 1763.36,4273.36 1732.93,4242.93 ; Cd1.1 2023.62,4226.38 1970,4280 1970,4310 ; U1.8 2055,4225 1970,4310 ; U2.8 2146.69,3553.31 2100,3600 ; Cd2.1 2170,3560 2130,3600 ; Cv1.2@2400,3938.61 Cv1.2 2438.61,3938.61 2460,3960 ; Cd3.1 3000,3510 3045,3555 ; U3.8 3045,3555 ; 1732.93,4242.93 1732.93,4362.93 1761.17,4391.17 1789.3,4391.17 1790,4390.47 1840.47,4390.47 1870,4420 1940,4420 1970,4390 1970,4310 ; 1732.93,4242.93 1732.93,4187.07 1830,4090 2390,4090 2460,4020 2460,3960 ; 2100,3600 L1.2 1743.62,3526.38 1750,3520 1750,3450 1870,3330 2440,3330 2470,3360 2690,3360 2790,3460 2980,3460 3045,3525 3045,3555 ; 2100,3600 2130,3600 ; 2130,3600 2270,3600 2400,3730 2400,3790 2460,3850 2460,3960
NetD1_2: D1.2 Rl.1 | length 224.4
  Top Layer w10: Rl.1@1790,4449.53 1799.53,4440 D1.2
NetR1_2: R1.2 R2.1 U1.3 | length 918.6
  Top Layer w10: R2.1 1793.36,4330 v1(1850,4330) 1906.64,4330 R1.2 ; U1.3@2337.09,4327.61 U1.3 2375,4325 2400,4350 2400,4450 v1(2380,4470)
  Bottom Layer w10: v1(1850,4330) 1990,4470 v1(2380,4470)
NetR3_1: R3.1 U2.3 | length 80.8
  Top Layer w10: R3.1 1861.39,3420 U2.3
NetR3_2: R3.2 U2.2 | length 79.8
  Top Layer w10: R3.2@1860.21,3470 U2.2
NetR5_2: R5.2 R6.1 U1.6 U1.7 | length 1038.4
  Top Layer w10: v1@2059.3,4323.71 2144.22,4323.71 U1.6 U1.7 ; v1(2530,3760) 2584.57,3760 2590.47,3754.09 R5.2
  Bottom Layer w10: v1@2059.3,4323.71 2040,4304.42 2040,4270 2530,3780 v1(2530,3760)
  other v1: 2060,4325
NetR6_2: R6.2 U3.3 | length 642.2
  Top Layer w10: R6.2 R6.2@2653,3762.72 ; R6.2@2664.4,3760 2690,3760 2750,3820 2750,3960 2810,4020 2900,4020 2945,3975 U3.3
NetR7_1: R7.1 R8.2 U3.2 | length 903.7
  Top Layer w10: R7.1@2530,3830 2534.41,3834.41 2534.41,3881.41 R8.2 ; R7.1@2534.41,3826.06 2561.22,3799.25 2699.25,3799.25 2730,3830 2730,3970 2800,4040 2950,4040 2995,3995 U3.2
NetR7_2: R7.2 Rv1.1 | length 196
  Top Layer w10: R7.2 2585.59,3965.59 2600,3980 Rv1.1@2600,4020
NetR9_1: R9.1 Rv1.2 Rv1.3 U3.1 | length 928.2
  Top Layer w10: Rv1.2@2640,3910 2660.64,3930.64 2660.64,3950.64 2690.55,3980.55 Rv1.3@2690.55,4014.33 ; Rv1.2 Rv1.2@2669.74,3934.46 ; Rv1.3@2707.2,3997.68 Rv1.3@2690.55,4014.33 ; U3.1@3045,3845 3045,4015 3000,4060 ; R9.1 3100,4020 3060,4060 3000,4060 ; Rv1.3@2690.55,4014.33 Rv1.3 2754.17,4024.17 2790,4060 3000,4060
NetR12_1: R12.1 U1.1 U1.2 | length 127.6
  Top Layer w10: U1.1 U1.2 ; U1.1@2336.15,4225 2342.44,4218.71 R12.1
NetRb1_1: Rb1.1 Ri1.2 U2.4 | length 602.4
  Top Layer w10: v1(1880,3370) U2.4 ; Rb1.1 2000,3650 1990,3660 v1(1990,3710) 1993.79,3710 2003.79,3700 Ri1.2
  Bottom Layer w10: v1(1880,3370) 1990.32,3480.32 1990.32,3709.68 v1(1990,3710)
NetRb2_1: Rb.1 Ri.2 U2.1 | length 431.5
  Top Layer w10: v1(1880,3520) U2.1 ; Ri.2 1926.21,3700 1936.21,3710 v1(1940,3710) 1940,3660 1930,3650 Rb.1
  Bottom Layer w10: v1(1880,3520) 1940,3580 v1(1940,3710)
NetRi1_1: Ri1.1 SGNL.2 | length 291.8
  Top Layer w10: Ri1.1@2080.67,3700 2080.67,3770.67 2104.65,3794.65 SGNL.2
NetRi2_1: Ri.1 SGNL.3 | length 330.3
  Top Layer w10: Ri.1@1849.33,3700 1849.33,3779.33 1947.17,3877.17 SGNL.3
pads on no net: SGNL.

## Polygon pours and split planes (outlines as drawn)
NetARD_2 on Top Layer "NETARD_2_L01_P004" (solid, remove dead copper, pour order 4): 2080,3310 2080,3280 2540,3280 2560,3300 2560,3340 2480,3340 2450,3310
NetARD_2 on Bottom Layer "NETARD_2_L02_P001" (solid, remove dead copper, pour order 1): 1680,4010 1700,3990 1700,3710 1520,3530 1520,3270 1580,3210 3210,3210 3270,3270 3270,4460 3210,4520 1740,4520 1680,4460

## Silkscreen, mask and mechanical layers (free items; w line width, h text height)
Top Overlay:
  text "EMG" at 2700,4260 h180
  text "v5.0" at 2985,4135 h60
  text "V" at 1760,3460 h40 r270
  text "G" at 1760,3410 h40 r270
  text "A" at 1760,3360 h40 r270
Mechanical 1:
  circle w10: c3050,3310 r44
  lines w10: 1500,3260 1500,3540 1680,3720 1680,3980 1660,4000 1660,4470 1730,4540 3220,4540 3290,4470 3290,3260 3220,3190 1570,3190 1500,3260
Mechanical 15:
  lines w3: 1500,3180 3290,3180 3290,4540 1500,4540 1500,3180